# Altium PCB STPMotorControl_1.PcbDoc
Units mm, origin at the board's own origin, x right, y up, seen from the top; angles counter-clockwise.
Board outline 86.99 x 73.02 mm, 4 copper layers (Top Layer, Int1 (GND), Int2 (GND), Bottom Layer), stack 1.369 mm thick; 82 components, 60 nets, 317 pads, 51 vias.
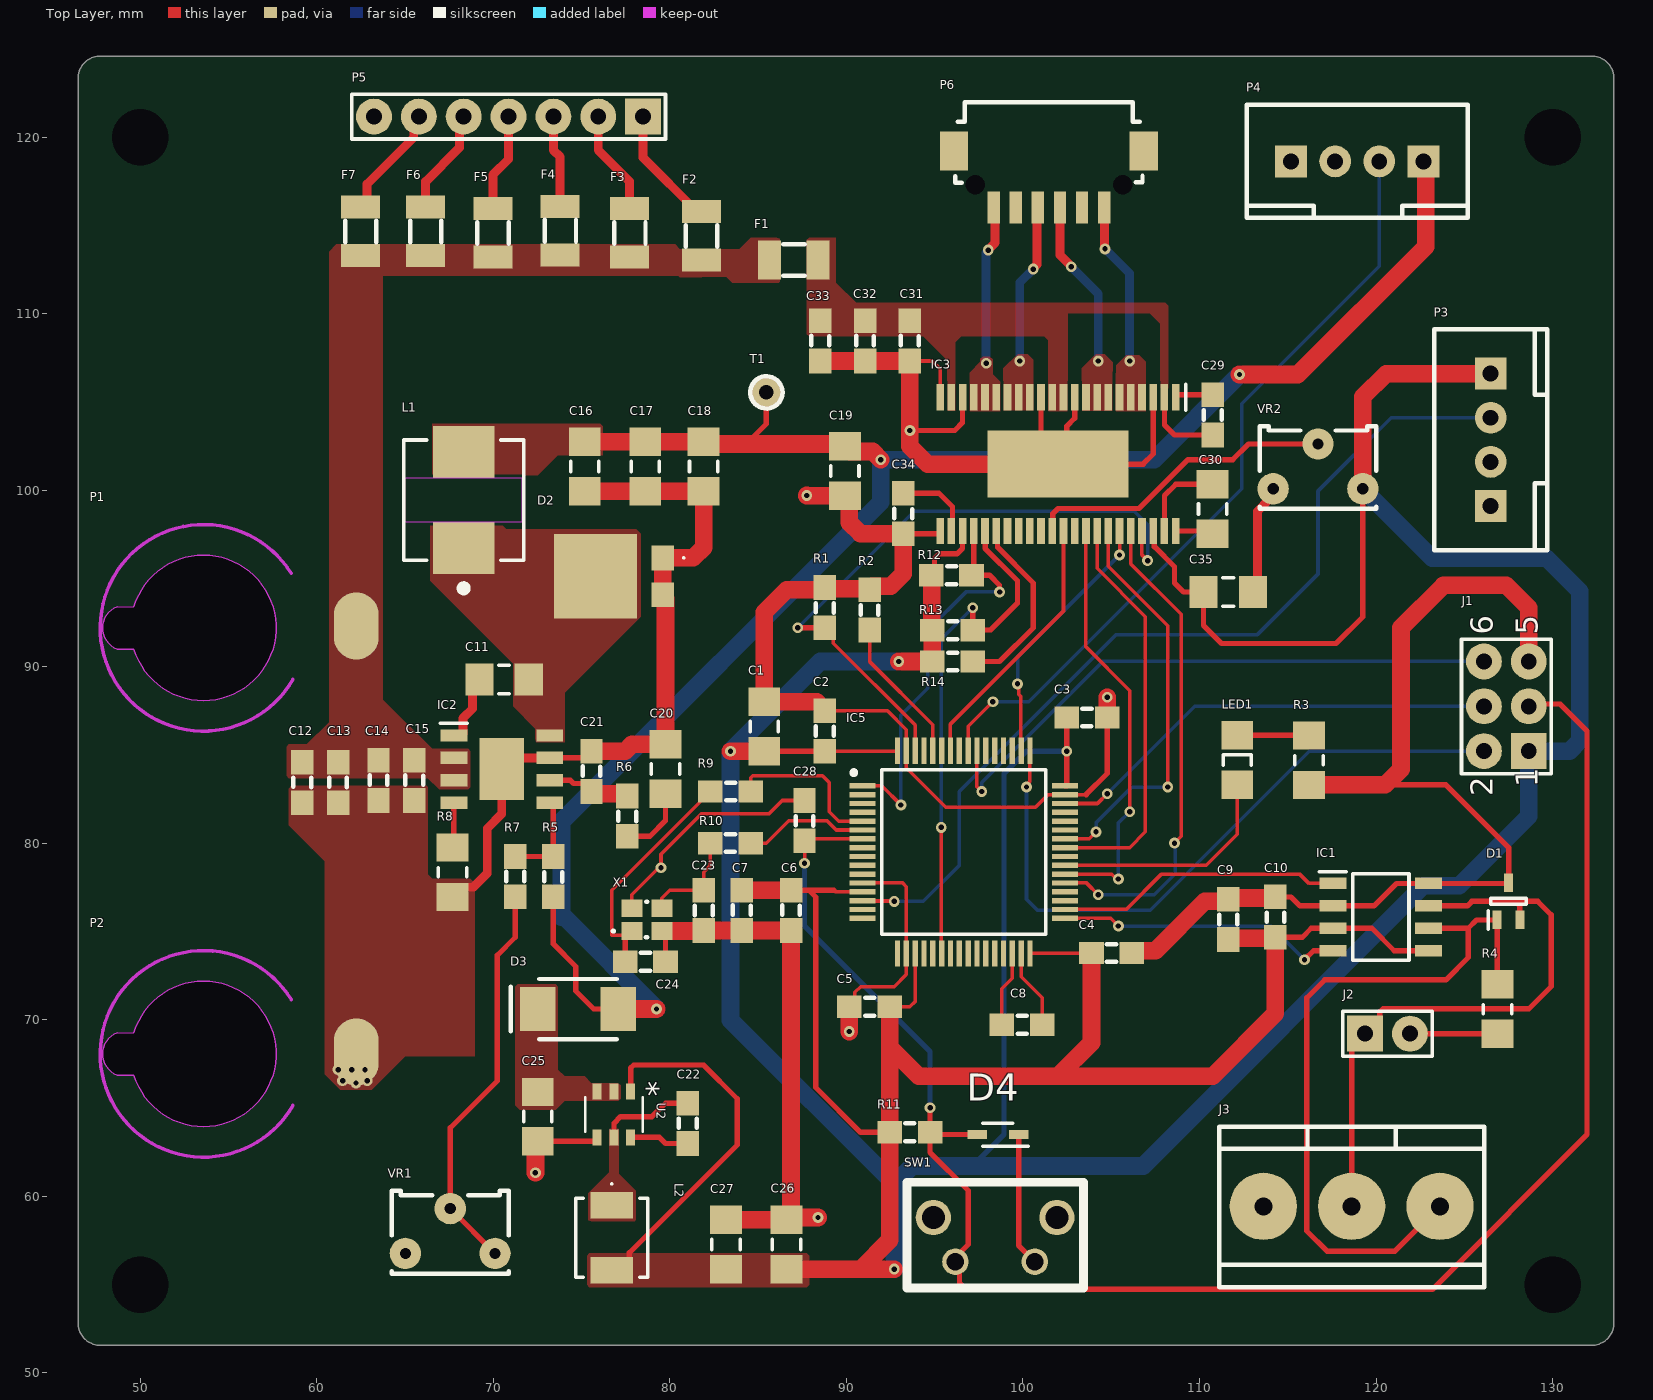
[diagram p0: Top Layer view]
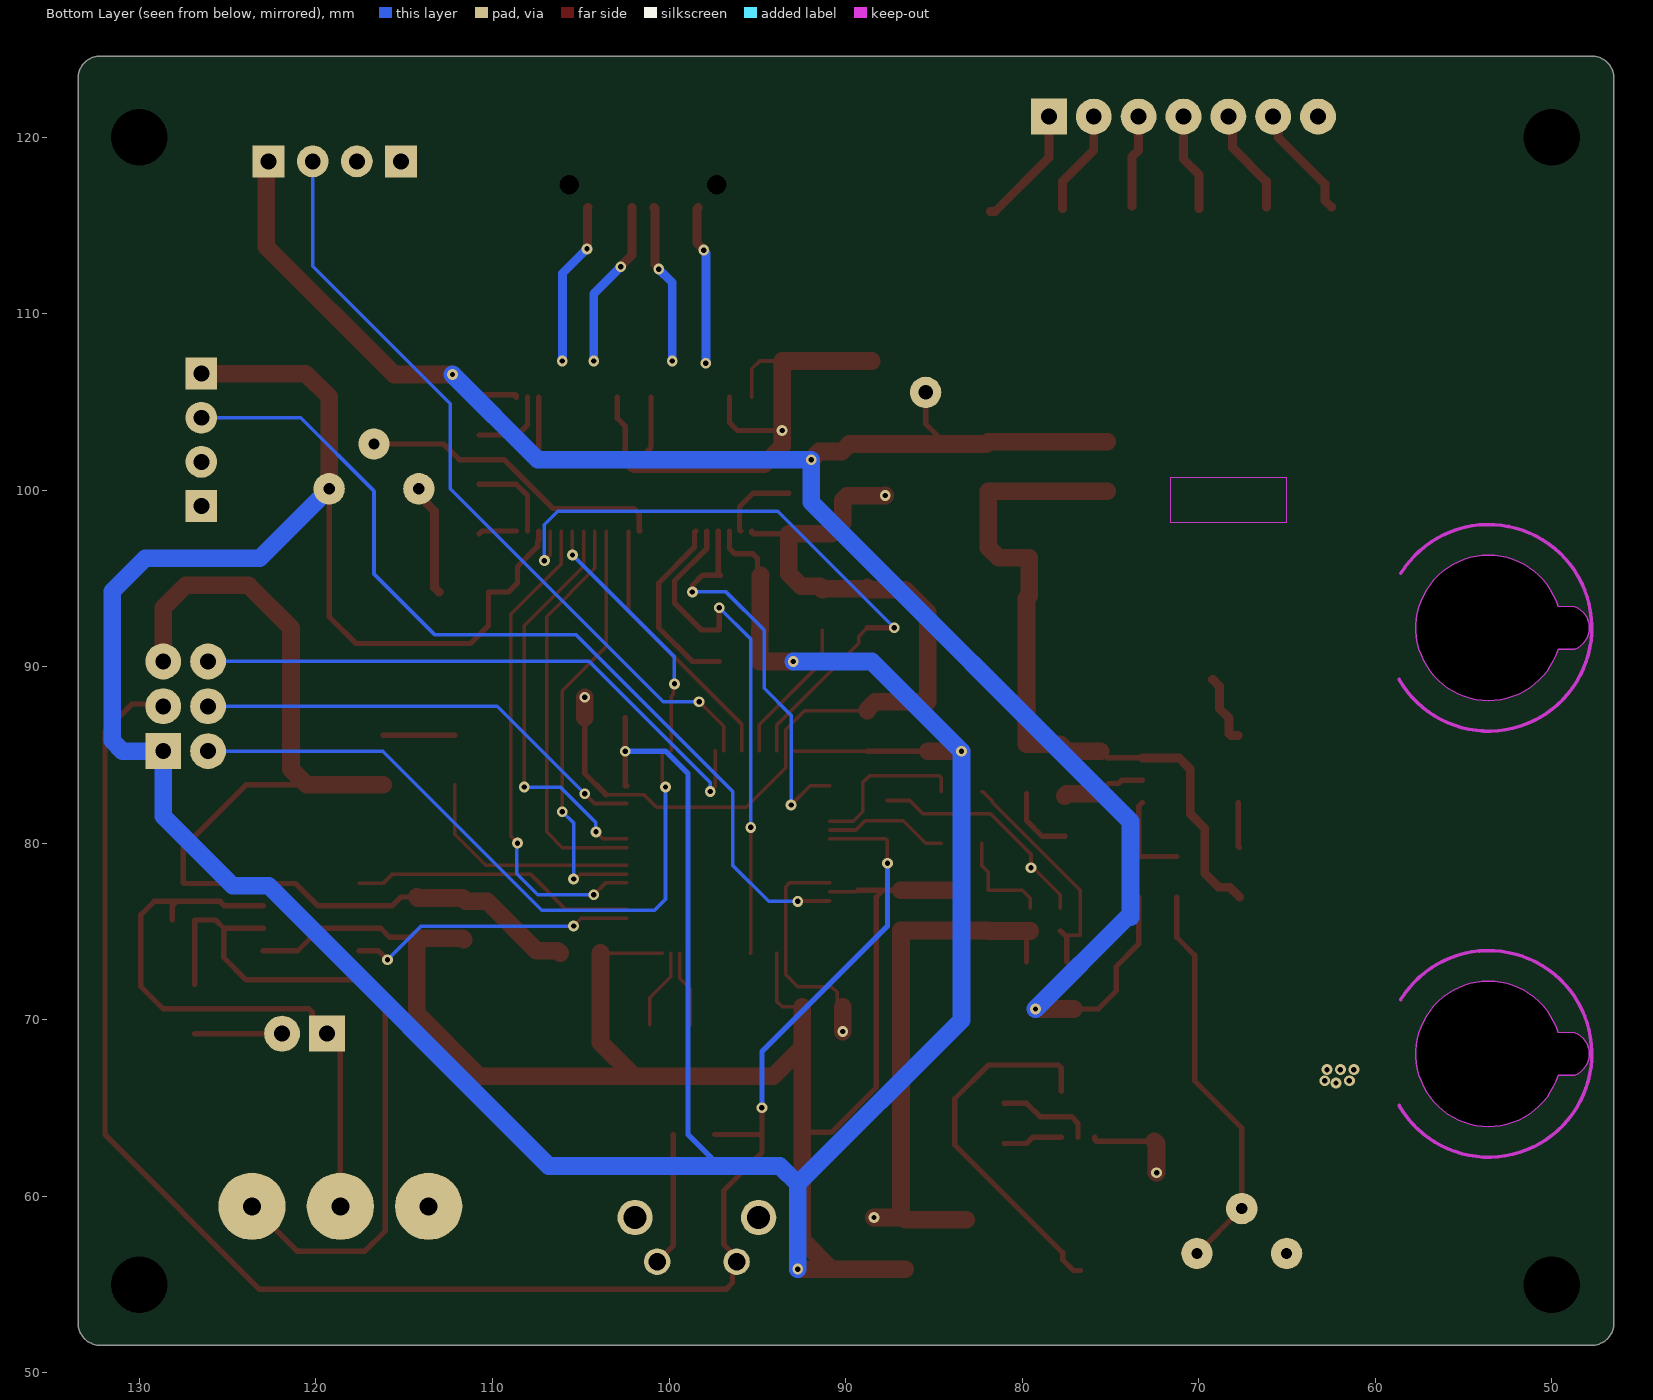
[diagram p1: Bottom Layer view, seen from below]
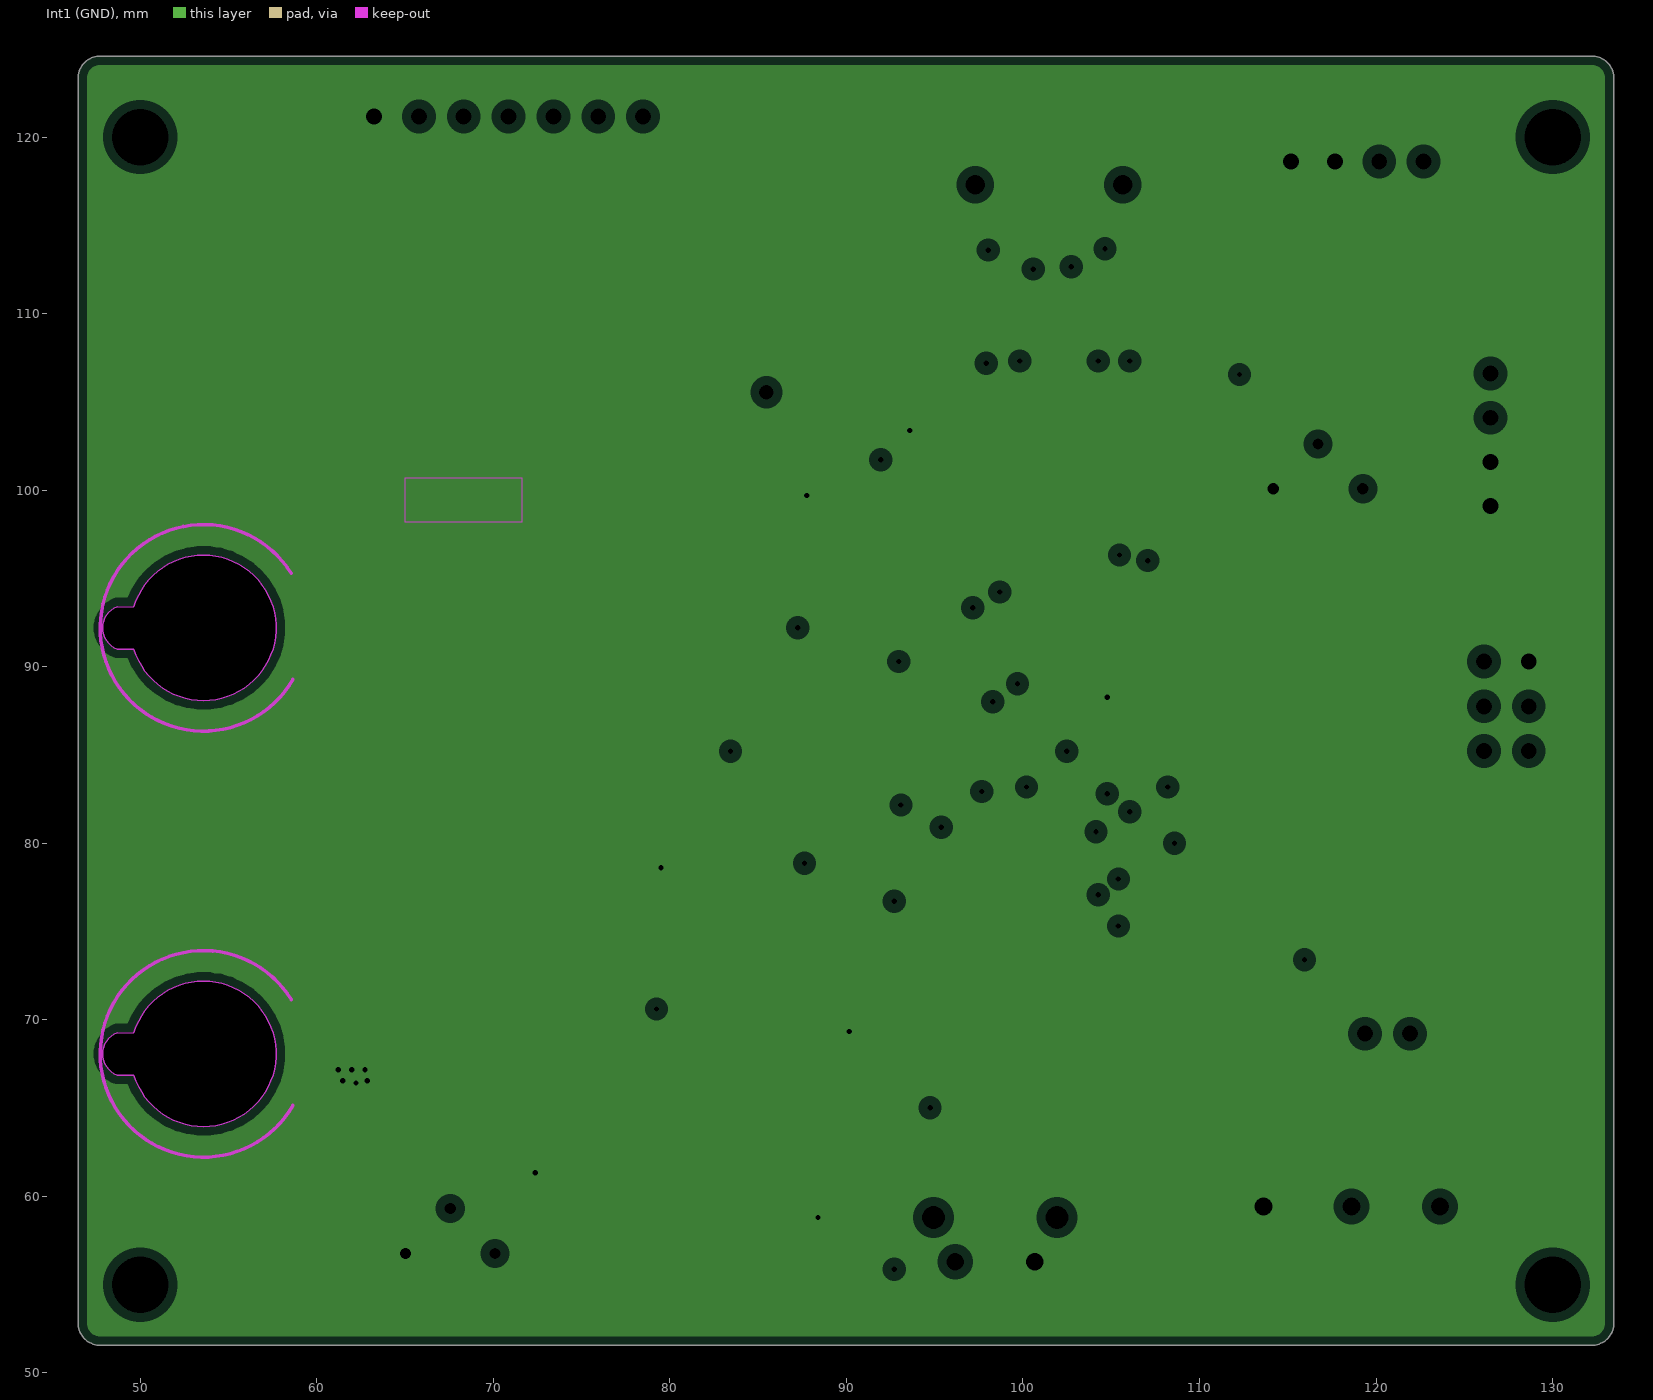
[diagram p2: Int1 (GND), clearances drawn from the general rule]
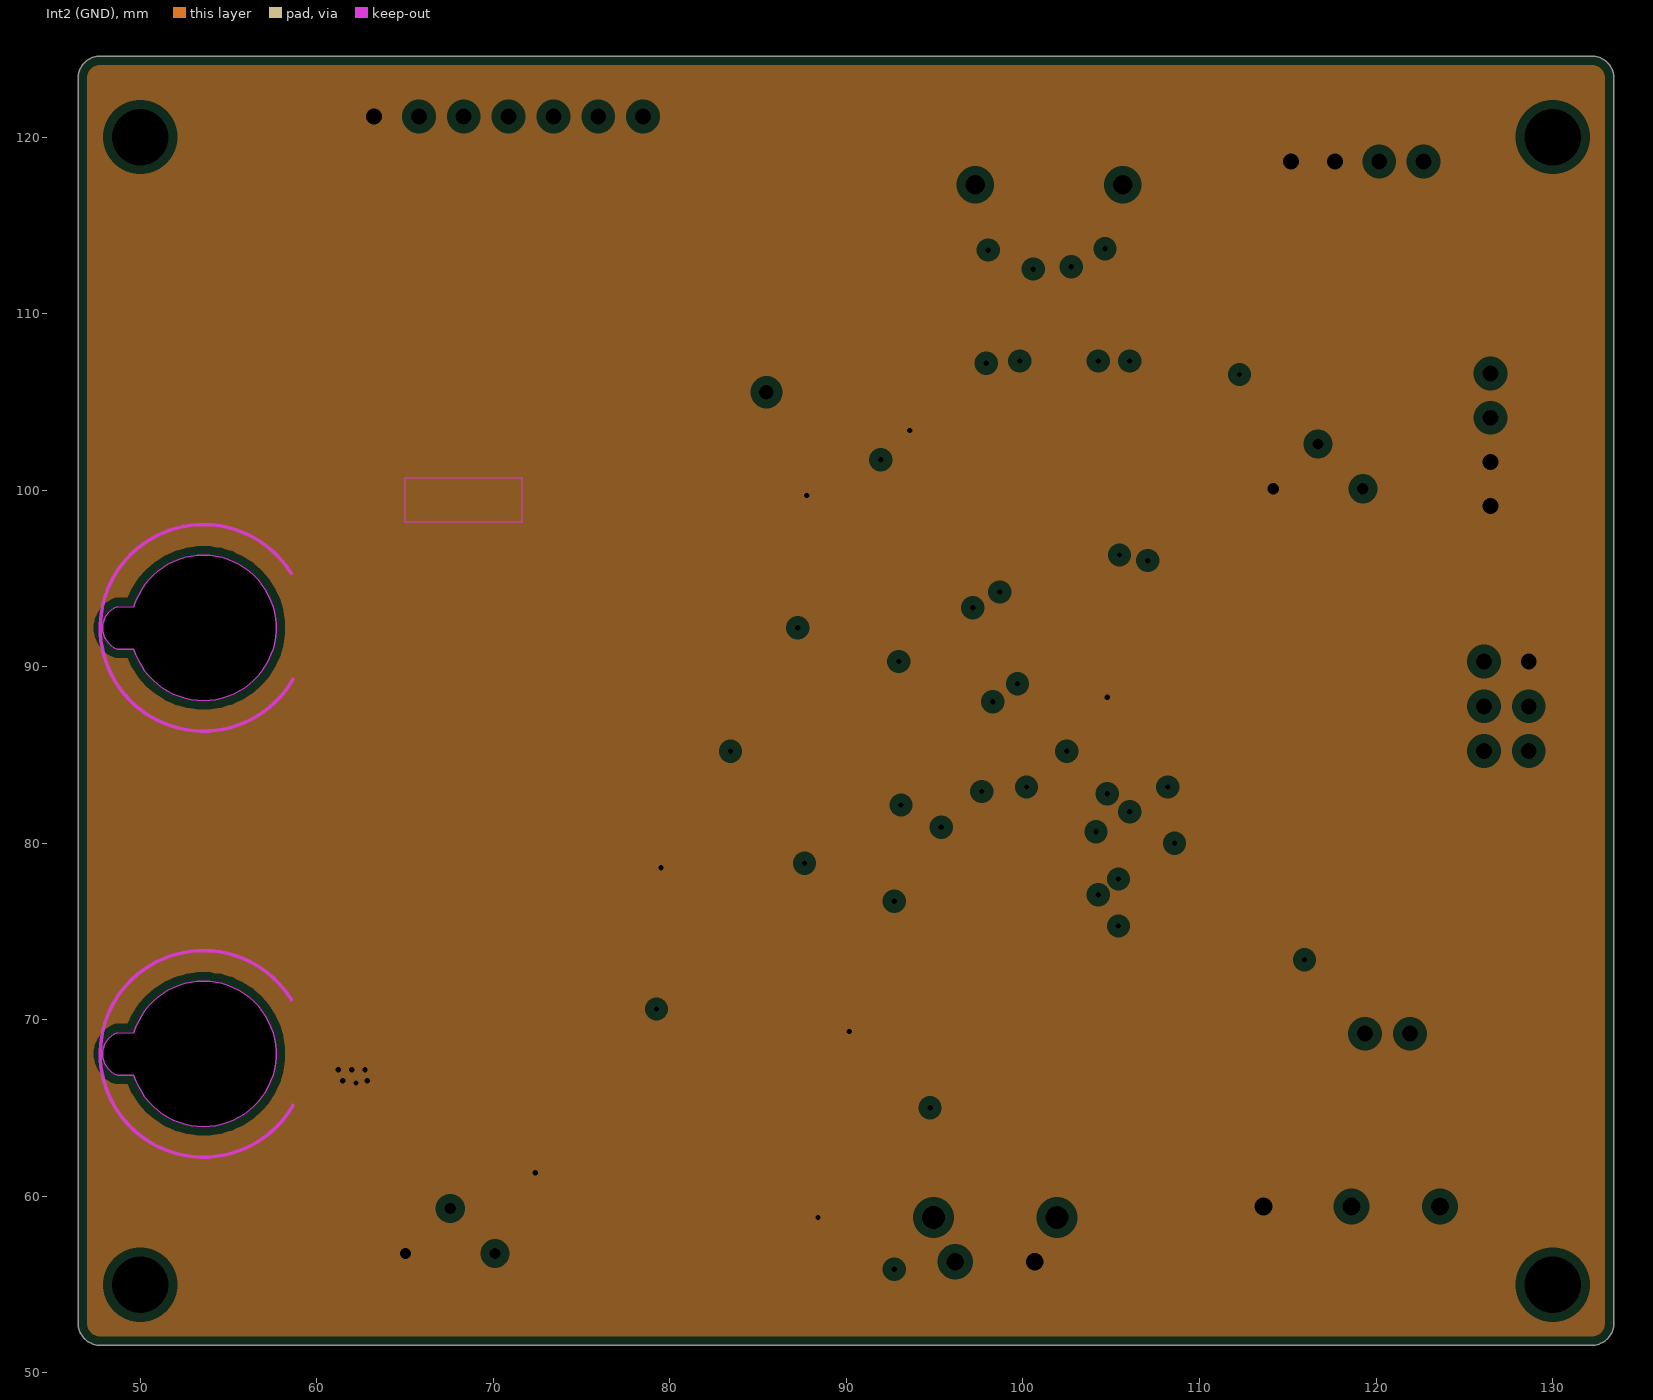
[diagram p3: Int2 (GND), clearances drawn from the general rule]
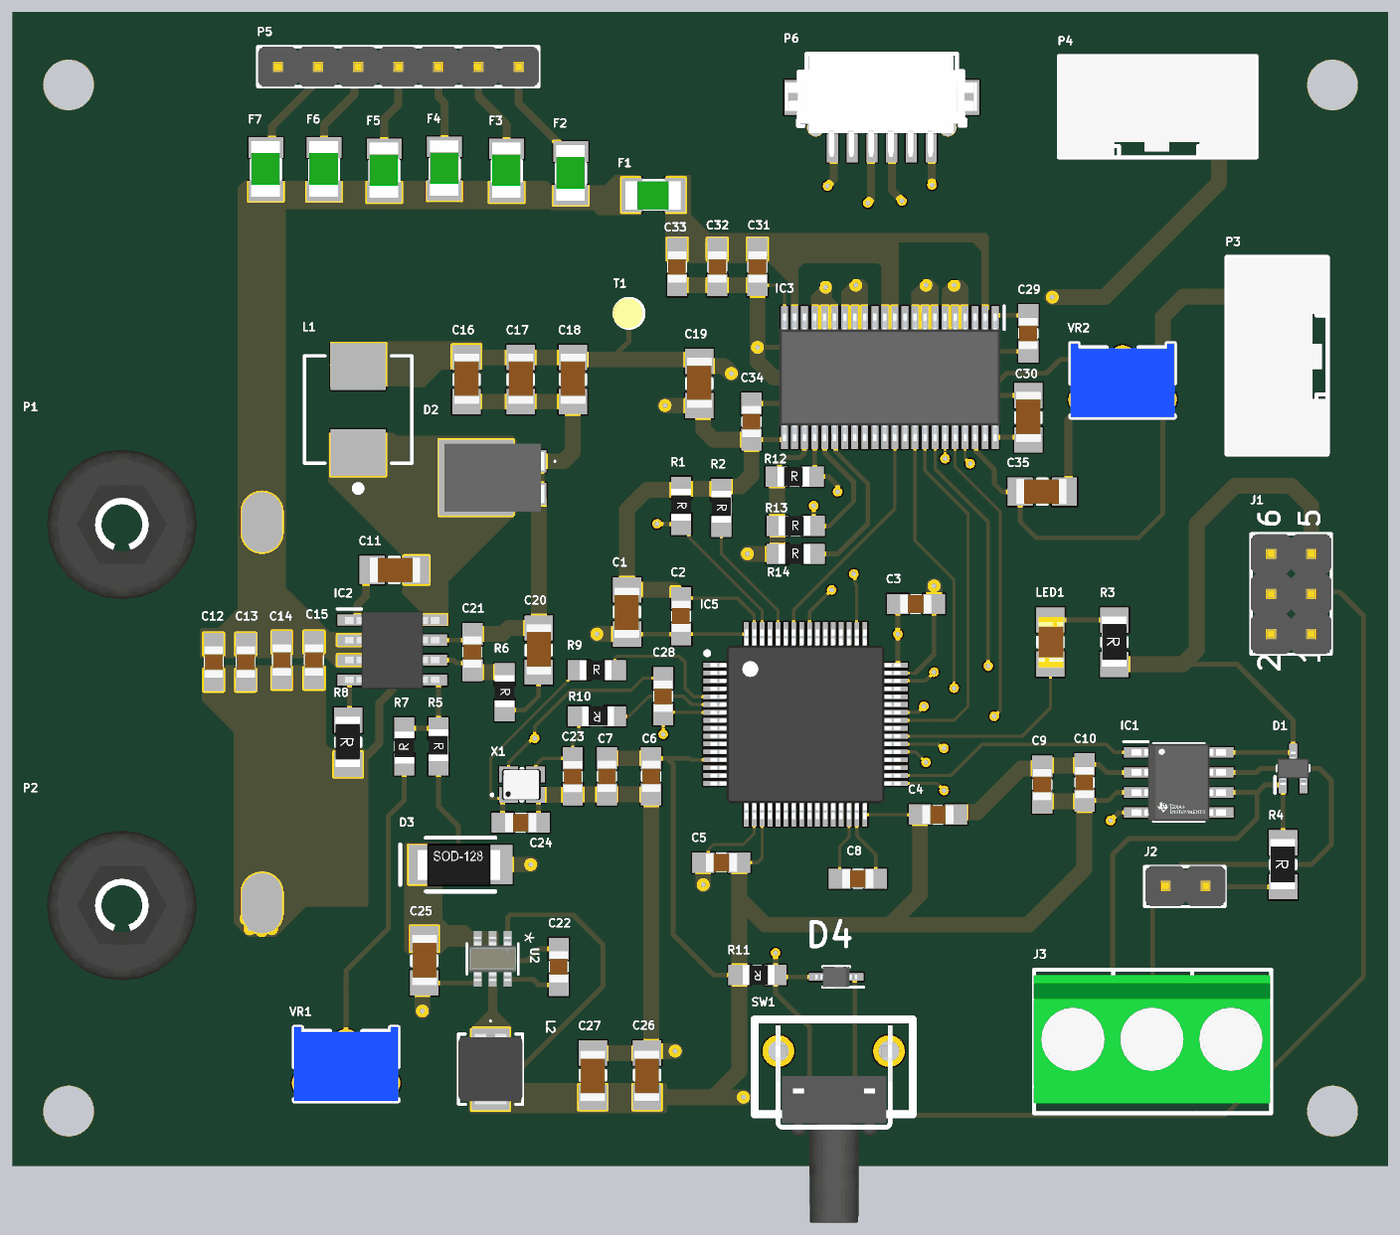
[diagram p4: 3D render of the assembled board from above, using the file's embedded part models]

## Layer stack, top to bottom
Top Solder: solder mask 0.0254, SM-001, Dk 4
Top Layer: signal copper 0.035
Dielectric 1: prepreg 0.1295, PP-017, Dk 4.3
Dielectric 2: prepreg 0.1295, PP-017, Dk 4.3
Int1 (GND): plane copper 0.035, net GND
Dielectric 3: core 0.7112, Core-039, Dk 4.8
Int2 (GND): plane copper 0.035, net GND
Dielectric 4: prepreg 0.1295, PP-017, Dk 4.3
Dielectric 5: prepreg 0.1295, PP-017, Dk 4.3
Bottom Layer: signal copper 0.035
Bottom Solder: solder mask 0.0254, SM-001, Dk 4

## Board outline
47.752,51.564 cw(c47.752,52.834) 46.482,52.834 46.482,123.319 cw(c47.752,123.319) 47.752,124.589 132.207,124.589 cw(c132.207,123.319) 133.477,123.319 133.477,52.834 cw(c132.207,52.834) 132.207,51.564

## Design rules (kind name [scope] priority, off if disabled: settings)
Clearance [All] p1: gap=0.2 ignorepadtopadclearanceinfootprint=TRUE
PlaneClearance [All] p1: clearance=0.508
PlaneConnect [All] p1: planeconnectstyle=Relief reliefexpansion=0.508 reliefentries=4 reliefconductorwidth=0.254 reliefairgap=0.254
PolygonConnect [All] p1: connectstyle=Direct reliefconductorwidth=0.254 reliefentries=4 polygonreliefangle="90 Angle" airgapwidth=0.254
RoutingVias [All] p1: holewidth=12 width=24 viastyle="Through Hole" minholewidth=12 minwidth=24 maxholewidth=12 maxwidth=24
SolderMaskExpansion [All] p1: expansion=0.102 istentingtop=FALSE
SupplyNets "Schematic Supply Nets_3" [InNet('+3V3')] p1: voltage=0.000
SupplyNets "Schematic Supply Nets_2" [InNet('+5V')] p2: voltage=0.000
SupplyNets "Schematic Supply Nets_1" [InNet('+48V')] p3: voltage=0.000
SupplyNets "Schematic Supply Nets" [InNet('GND')] p4: voltage=0.000
UnRoutedNet [All] p1: checkbadconnections=TRUE
Width [All] p1: maxlimit=1 minlimit=0.2 preferedwidth=0.3 minimp=50.000000 maximp=50.000000 favimp=50.000000
27 further rules are at their usual default settings.

## Classes and differential pairs
component class Designator: F2 F3 F4 F5 F6 F7 P3 P4 P5 P6

## Components (designator, comment, footprint, x,y, rotation, side; value= is the part's Value field where it differs from the comment)
C1 "4.7uF" CAP_1206 85.344,88.017 r270 top
C2 "100nF" CAP_0805 88.773,87.503 r270 top
C3 "100nF" CAP_0805 104.775,87.122 r180 top
C4 "100nF" CAP_0805 106.172,73.787 r180 top
C5 "100nF" CAP_0805 90.17,70.739 r0 top
C6 "1uF" CAP_0805 86.868,75.057 r90 top
C7 "100nF" CAP_0805 84.074,75.057 r90 top
C8 "2.2uF" CAP_0805 98.806,69.723 r0 top
C9 "1uF" CAP_0805 111.633,76.835 r270 top
C10 "100nF" CAP_0805 114.3,76.962 r270 top
C11 "0.1uF" CAP_1206 69.215,89.281 r0 top
C12 "2.2uF" CAP_0805 59.182,82.296 r90 top
C13 "2.2uF" CAP_0805 61.214,82.296 r90 top
C14 "2.2uF" CAP_0805 63.5,82.423 r90 top
C15 "2.2uF" CAP_0805 65.532,82.423 r90 top
C16 "47uF" CAP_1206 75.184,99.943 r90 top
C17 "47uF" CAP_1206 78.613,99.943 r90 top
C18 "47uF" CAP_1206 81.915,99.943 r90 top
C19 "10uF" CAP_1206 89.916,99.689 r90 top
C20 "8.2nF" CAP_1206 79.756,82.804 r90 top
C21 "100pF" CAP_0805 75.565,82.931 r90 top
C22 "100nF" CAP_0805 81.026,62.992 r90 top
C23 "7pF" CAP_0805 81.915,77.343 r270 top
C24 "7pF" CAP_0805 77.47,73.279 r0 top
C25 "10uF" CAP_1206 72.517,63.119 r90 top
C26 "22uF" CAP_1206 86.614,58.68 r270 top
C27 "22uF" CAP_1206 83.185,58.674 r270 top
C28 "100nF" CAP_0805 87.63,82.423 r270 top
C29 "1uF" CAP_0805 110.744,105.41 r270 top
C30 "0.1uF" CAP_1206 110.744,97.53 r90 top
C31 "1uF" CAP_0805 93.599,107.315 r90 top
C32 "10nF" CAP_0805 91.059,107.315 r90 top
C33 "10nF" CAP_0805 88.519,107.315 r90 top
C34 "1uF" CAP_0805 93.218,99.822 r270 top
C35 "0.1uF" CAP_1206 113.03,94.234 r180 top
D1 "ESDCAN03-2BWY" SOT65P210X110-3N 127.508,76.708 r90 top
D2 "SS5P6-M3_87A" SS5P6M387A 76.835,95.123 r90 top
D3 "PMEG3050BEP" SOD-128 74.803,70.612 r0 top
D4 "TSD05CDYFR" SOD2613X100N 98.584,63.5 r180 top
F1 "1206L035/16YR" MC36207 88.392,113.03 r180 top
F2 "1206L035/16YR" MC36207 81.788,113.03 r90 top
F3 "1206L035/16YR" MC36207 77.724,113.201 r90 top
F4 "1206L035/16YR" MC36207 73.787,113.328 r90 top
F5 "1206L035/16YR" MC36207 69.977,113.201 r90 top
F6 "1206L035/16YR" MC36207 66.167,113.284 r90 top
F7 "1206L035/16YR" MC36207 62.484,113.284 r90 top
IC1 "TCAN3403DRQ1" SOIC127P600X175-8N 120.269,75.819 r0 top
IC2 "RT6365GSP" SOIC127P600X175-9N 70.485,84.201 r0 top
IC3 "DRV8462DDWR" SOP64P810X120-45N 101.981,101.473 r270 top
IC5 "STM32C552RET6" QFP50P1200X1200X160-64N 96.647,79.502 r0 top
J1 "HDR3X2" HDR2X3_AUT 128.651,85.217 r90 top
J2 "HDR1X2V" HDR1X2_AUT 119.38,69.215 r0 top
J3 "SCREWX3" SCREW3_AUT 113.618,59.436 r0 top
L1 "6.8uH" WE-LHMI_7050 68.326,99.441 r90 top
L2 "3.3uH" SRP4020TA3R3M 76.708,57.658 r270 top
LED1 "LED-RED" LED1206R 112.141,83.312 r90 top
P1 "BS" Banana_AUT 53.594,92.202 r180 top
P2 "BS" Banana_AUT 53.594,68.072 r180 top
P3 "JST 4" XA-4 126.492,99.1 r90 top
P4 "JST 4" XA-4 115.182,118.618 r0 top
P5 "HDR1X7V" HDR1X7_AUT 78.486,121.158 r180 top
P6 "DF13-6P" DF13-6 101.473,117.602 r0 top
R1 "5k1" RES_0805 88.773,94.488 r270 top
R2 "10k" RES_0805 91.313,94.361 r270 top
R3 "1k" RES_1206 116.205,86.106 r270 top
R4 "120R" RES_1206 126.873,72.009 r270 top
R5 "52k3" RES_0805 73.406,79.248 r270 top
R6 "10k5" RES_0805 77.597,82.677 r270 top
R7 "9k1" RES_0805 71.247,76.962 r90 top
R8 "249k" RES_1206 67.691,79.762 r270 top
R9 "0R" RES_0805 82.296,82.931 r0 top
R10 "0R" RES_0805 84.582,80.01 r180 top
R11 "10k" RES_0805 94.742,63.627 r180 top
R12 "10k" RES_0805 94.806,95.187 r0 top
R13 "10k" RES_0805 94.869,92.075 r0 top
R14 "10k" RES_0805 94.869,90.297 r0 top
SW1 "EVQPF" EVQPF203M 98.425,58.801 r0 top
T1 "Terminal1" PAD1_AUT 85.471,105.537 r0 top
U2 "AP63203QWU-7" TSOT26_DIO 76.835,64.643 r270 top
VR1 "2k" 3362S 67.564,58.039 r0 top
VR2 "30k" 3362S 116.713,101.346 r0 top
X1 "24MHz" CX2520SB 77.851,75.027 r0 top

## Footprints (in the part's own frame and the unit in brackets; to place one, negate y for a bottom-side part, rotate by r counter-clockwise, add the part's x,y. Pads: shape width x height; smd on the part's side, far side on the other; paste and mask are expansions set on the pad)
3362S [mil] "3362 - 1/4 ” Square Trimpot, Trimming Potentiometer"
  round 70 hole 25: 1(100,-50) 2(-100,-50) W(0,50)
  silkscreen extent -130,-95 130,90, body extent -130,-95 130,91, height 278
Banana_AUT [mm] "Power (11mm Diameter, 15.5mm Length)"
  oval 2.54x3.81 smd: 1(-8.65,-0.1)
  Keep-Out Layer board cut-out: 3.945,-1.205 2.834,-2.995 0.983,-4.002 -1.124,-3.962 -2.935,-2.885 -3.978,-1.054 -3.978,1.054 -2.935,2.885 -1.124,3.962 0.983,4.002 2.834,2.995 3.945,1.205 3.945,1.205 4.902,1.205 4.902,1.205 5.399,0.849 5.679,0.306 5.679,-0.306 5.399,-0.849 4.902,-1.205 4.902,-1.205 4.902,-1.205
  Keep-Out Layer lines w0.025: 4.902,1.205 cw(c4.416,0) 4.902,-1.205 3.945,-1.205 cw(c0.005,0) 3.945,1.205 4.902,1.205
  Keep-Out Layer lines w0.2: -4.969,-3.079 ccw(c0.005,0) -5.062,2.923
  body extent -5.17,-4.7 5.62,4.8, height 4.57
CAP_0805 [mil] "Body 2.0 x 1.3mm (LxW typ)"
  rect 55x50 smd: 1(0,0) 2(90,0)
  silkscreen extent 35,-20 56,20, body extent 6,-24 85,24, height 47
CAP_1206 [mm] "Body 3.2 x 1.6 mm (LxW typ)"
  rect 1.6x1.8 smd: 1(0,0) 2(2.8,0)
  silkscreen extent 1.1,-0.8 1.7,0.8, body extent -0.15,-0.81 3.05,0.79, height 1.6
CX2520SB [mm] "Crystal Units, Body 2.5×2.0 mm (LxW)"
  rect 1.2x1 smd: 1(0,0) 2(1.7,0) 3(1.7,1.3) 4(0,1.3)
  silkscreen extent -1.1,-0.35 0.87,1.65, body extent -0.45,-0.35 2.05,1.65, height 0.79
DF13-6 [mm] "HIROSE Right Angle, DF13 Series, Surface Mount, Header, 6 Contacts, 1.25 mm"
  rect 1.6x2.2 smd: 0(-5.375,1.6) 0(5.375,1.6)
  round 1 hole 1.1: 0(-4.175,-0.3) 0(4.175,-0.3)
  rect 0.7x1.8 smd: 1(-3.125,-1.6) 2(-1.875,-1.6) 3(-0.625,-1.6) 4(0.625,-1.6) 5(1.875,-1.6) 6(3.125,-1.6)
  silkscreen extent -5.3,-0.2 5.3,4.38, body extent -6.12,-2.15 6.03,4.35, height 3.58
EVQPF203M [mm] "PANASONIC  EVQPF203M  SWITCH, TACTILE, SPST-NO, 20mA, 15VDC"
  round 2 hole 1.3: 0(-3.5,0) 0(3.5,0)
  round 1.5 hole 1: 1(-2.25,-2.5) 2(2.25,-2.5)
  silkscreen extent -5,-4 5,2, body extent -3.67,-10.87 3.73,1.63, height 7
HDR1X2_AUT [mil] "Connector; Header; 2 Position; Pitch 2.54mm, Straight"
  rect 80x80 hole 35.43: 1(0,0)
  round 80 hole 35.43: 2(100,0)
  silkscreen extent -50,-50 150,50, body extent -48,-48 152,52, height 399
HDR1X7_AUT [mil] "Connector; Header; 7 Position; Pitch 2.54mm, Straight"
  rect 80x80 hole 35.43: 1(0,0)
  round 80 hole 35.43: 2(100,0) 3(200,0) 4(300,0) 5(400,0) 6(500,0) 7(600,0)
  silkscreen extent -50,-50 650,50, body extent -50,-50 650,50, height 398
HDR2X3_AUT [mil] "Connector; Header; 3x2 Position"
  rect 80x80 hole 35.43: 1(0,0)
  round 80 hole 35.43: 2(0,100) 3(100,0) 4(100,100) 5(200,0) 6(200,100)
  silkscreen extent -50,-50 250,150, body extent -50,-50 250,150, height 398
LED1206R [mm] "SMD; Red LED; Body 3.2 x 1.6 mm"
  rect 1.6x1.8 smd: A(0,0) K(2.8,0)
  silkscreen extent 1.1,-0.8 1.7,0.8, body extent -0.2,-0.84 3,0.76, height 1.09
MC36207 [mm] "FUSE, PTC RESET. 3.5x1.8x0.75mm (LxWxH)"
  rect 1.3x2.2 smd: 1(0,0) 2(2.75,0)
  silkscreen extent 0.75,-0.9 1.97,0.87, body extent -0.35,-0.88 3.15,0.92, height 0.75
PAD1_AUT [mil] "Teminal Pad; 70 x 70 mil; Hole, 32mil"
  round 70 hole 32: 1(0,0)
  silkscreen extent -36,-36 36,36, body extent -40,-37 34,37, height 319
QFP50P1200X1200X160-64N [mm]
  rect 1.475x0.3 smd: 1(-5.738,3.75) 2(-5.738,3.25) 3(-5.738,2.75) 4(-5.738,2.25) 5(-5.738,1.75) 6(-5.738,1.25) 7(-5.738,0.75) 8(-5.738,0.25) 9(-5.738,-0.25) 10(-5.738,-0.75) 11(-5.738,-1.25) 12(-5.738,-1.75) 13(-5.738,-2.25) 14(-5.738,-2.75) 15(-5.738,-3.25) 16(-5.738,-3.75) 33(5.738,-3.75) 34(5.738,-3.25) 35(5.738,-2.75) 36(5.738,-2.25) 37(5.738,-1.75) 38(5.738,-1.25) 39(5.738,-0.75) 40(5.738,-0.25) 41(5.738,0.25) 42(5.738,0.75) 43(5.738,1.25) 44(5.738,1.75) 45(5.738,2.25) 46(5.738,2.75) 47(5.738,3.25) 48(5.738,3.75)
  rect 0.3x1.475 smd: 17(-3.75,-5.738) 18(-3.25,-5.738) 19(-2.75,-5.738) 20(-2.25,-5.738) 21(-1.75,-5.738) 22(-1.25,-5.738) 23(-0.75,-5.738) 24(-0.25,-5.738) 25(0.25,-5.738) 26(0.75,-5.738) 27(1.25,-5.738) 28(1.75,-5.738) 29(2.25,-5.738) 30(2.75,-5.738) 31(3.25,-5.738) 32(3.75,-5.738) 49(3.75,5.738) 50(3.25,5.738) 51(2.75,5.738) 52(2.25,5.738) 53(1.75,5.738) 54(1.25,5.738) 55(0.75,5.738) 56(0.25,5.738) 57(-0.25,5.738) 58(-0.75,5.738) 59(-1.25,5.738) 60(-1.75,5.738) 61(-2.25,5.738) 62(-2.75,5.738) 63(-3.25,5.738) 64(-3.75,5.738)
  silkscreen extent -6.35,-4.65 4.65,4.65, body extent -6.01,-6.01 6.01,6.01, height 1.54
RES_0805 [mil] "Body 2.0 x 1.3mm (LxW typ)"
  rect 55x50 smd: 1(0,0) 2(90,0)
  silkscreen extent 35,-20 56,20, body extent 3,-25 82,24, height 20
RES_1206 [mm] "Body 3.2 x 1.6 mm (LxW typ)"
  rect 1.6x1.8 smd: 1(0,0) 2(2.8,0)
  silkscreen extent 1.14,-0.8 1.65,0.8, body extent -0.21,-0.8 2.96,0.75, height 0.6
SCREW3_AUT [mil] "PCB Terminal Interlocking Block; CMM; 3 Poles; Pitch, 5 mm"
  round 150 hole 40: 1(0,0) 2(196.85,0) 3(393.7,0)
  silkscreen extent -98,-180 492,178, body extent -100,-155 490,164, height 394
SOD2613X100N [mm]
  rect 1.1x0.5 smd: 1(-1.175,0) 2(1.175,0)
  silkscreen extent -1.73,-0.65 0.85,0.65, body extent -1.33,-0.65 1.33,0.65, height 1
SOD-128 [mm] "SMD, 2 Lead, Body 4.0x2.7mm"
  rect 2x2.5 smd: A(2.286,0) K(-2.286,0)
  silkscreen extent -3.81,-1.7 2.2,1.7, body extent -2.7,-1.37 2.5,1.33, height 1.11
SOIC127P600X175-8N [mm]
  rect 1.528x0.65 smd: 1(-2.711,1.905) 2(-2.711,0.635) 3(-2.711,-0.635) 4(-2.711,-1.905) 5(2.711,-1.905) 6(2.711,-0.635) 7(2.711,0.635) 8(2.711,1.905)
  silkscreen extent -3.47,-2.45 1.6,2.58, body extent -3,-2.45 3,2.45, height 1.75
SOIC127P600X175-9N [mm]
  rect 1.522x0.7 smd: 1(-2.714,1.905) 2(-2.714,0.635) 3(-2.714,-0.635) 4(-2.714,-1.905) 5(2.714,-1.905) 6(2.714,-0.635) 7(2.714,0.635) 8(2.714,1.905)
  rect 2.5x3.5 smd: 9(0,0)
  silkscreen extent -3.47,2.61 -1.95,2.61, body extent -3,-2.45 3,2.45, height 1.46
SOP64P810X120-45N [mm]
  rect 1.475x0.435 smd: 1(-3.788,6.668) 2(-3.788,6.032) 3(-3.788,5.398) 4(-3.788,4.762) 5(-3.788,4.128) 6(-3.788,3.492) 7(-3.788,2.858) 8(-3.788,2.222) 9(-3.788,1.588) 10(-3.788,0.952) 11(-3.788,0.318) 12(-3.788,-0.318) 13(-3.788,-0.952) 14(-3.788,-1.588) 15(-3.788,-2.222) 16(-3.788,-2.858) 17(-3.788,-3.492) 18(-3.788,-4.128) 19(-3.788,-4.762) 20(-3.788,-5.398) 21(-3.788,-6.032) 22(-3.788,-6.668) 23(3.788,-6.668) 24(3.788,-6.032) 25(3.788,-5.398) 26(3.788,-4.762) 27(3.788,-4.128) 28(3.788,-3.492) 29(3.788,-2.858) 30(3.788,-2.222) 31(3.788,-1.588) 32(3.788,-0.952) 33(3.788,-0.318) 34(3.788,0.318) 35(3.788,0.952) 36(3.788,1.588) 37(3.788,2.222) 38(3.788,2.858) 39(3.788,3.492) 40(3.788,4.128) 41(3.788,4.762) 42(3.788,5.398) 43(3.788,6.032) 44(3.788,6.668)
  rect 3.8x8 smd: 45(0,0)
  silkscreen extent -4.52,7.23 -3.05,7.23, body extent -4.05,-7 4.05,7, height 1.2
SOT65P210X110-3N [mm]
  rect 1.05x0.5 smd: 1(-1.05,0.65) 2(-1.05,-0.65) 3(1.05,0)
  silkscreen extent -1.58,-1 0.18,1.15, body extent -1.05,-1 1.05,1, height 1.1
SRP4020TA3R3M [mm]
  rect 1.5x2.4 smd: 1(-1.85,0) 2(1.85,0)
  silkscreen extent -3.1,-2.03 2.22,2.03, body extent -2.22,-2.03 2.22,2.03, height 1.77
SS5P6M387A [mm]
  rect 1.4x1.27 smd: 1(1.04,-2.765) 2(-1.04,-2.765)
  rect 4.8x4.72 smd: 3(0,1.04)
  silkscreen extent 0.99,-4 1.09,-3.9, body extent -2.15,-3.27 2.15,3.05, height 1.3
TSOT26_DIO [mil]
  rect 35.5x20 smd paste+0 mask+0: 1(-51.25,37.4) 2(-51.25,0) 3(-51.25,-37.4) 4(51.25,-37.4) 5(51.25,0) 6(51.25,37.4)
  silkscreen extent -39,-64 39,64, body extent -55,-59 55,59, height 39
WE-LHMI_7050 [mm]
  rect 2.95x3.5 smd paste+0 mask+0.102: 1(-2.725,0) 2(2.725,0)
  Keep-Out Layer region: 1.25,-3.3 -1.25,-3.3 -1.25,3.3 1.25,3.3
  silkscreen extent -5.2,-3.4 3.4,3.4
XA-4 [mm] "XA Connector (JST), 4 Pins, Pitch 2.5mm"
  rect 1.8x1.8 hole 0.9: 1(7.5,0) 4(0,0)
  round 1.8 hole 0.9: 2(5,0) 3(2.5,0)
  silkscreen extent -2.5,-3.2 10,3.2, body extent -2.55,-3.23 9.95,3.17, height 8.8

## Part data
C1 C11 C16 C17 C18 C19 C20 C25 C26 C27 C30 C35: library part "CAPN 1206", "Non Polarized Capacitor, SMD, 1206"
C2 C3 C4 C5 C6 C7 C8 C9 C10 C12 C13 C14 C15 C21 C22 C23 C24 C28 C29 C31 C32 C33 C34: library part "CAPN 0805", "Non Polarized Capacitor, SMD, 0805"
D1: "TVS Diode (Uni-directional)", Manufacturer_Name=STMicroelectronics, Mouser Part Number=511-ESDCAN03-2BWY, Arrow Part Number=ESDCAN03-2BWY, Arrow Price/Stock=https://www.arrow.com/en/products/esdcan03-2bwy/stmicroelectronics.html?utm_currency=USD&region=europe, Datasheet Link=https://www.st.com/resource/en/datasheet/esdcan03-2bwy.pdf, Height=1.1mm, Manufacturer_Part_Number=ESDCAN03-2BWY, Mouser Price/Stock=https://www.mouser.co.uk/ProductDetail/STMicroelectronics/ESDCAN03-2BWY?qs=FqY30PPN9V2iiokjuqa22Q%3D%3D
D2: "Schottky Diode", Arrow Part Number=SS5P6-M3/87A, Manufacturer_Name=Vishay, Mouser Part Number=625-SS5P6-M3/87A, Arrow Price/Stock=https://www.arrow.com/en/products/ss5p6-m387a/vishay?utm_currency=USD&region=nac, Datasheet Link=https://www.vishay.com/docs/88988/ss5p6.pdf, Height=1.2mm, Manufacturer_Part_Number=SS5P6-M3/87A, Mouser Price/Stock=https://www.mouser.co.uk/ProductDetail/Vishay-General-Semiconductor/SS5P6-M3-87A?qs=XGzIaZb%2FFYLx0h%2FWoI%2FVUQ%3D%3D
D3: "Schottky REC, 30V, 5A, SMD", Supplier Part Number 1=1829196, Supplier 1=Farnell
D4: "TVS Diode (Bi-directional)", Manufacturer_Name="Texas Instruments", Mouser Part Number=595-TSD05CDYFR, Arrow Part Number=TSD05CDYFR, Arrow Price/Stock=https://www.arrow.com/en/products/tsd05cdyfr/texas-instruments.html?utm_currency=USD&region=nac, Datasheet Link=https://www.ti.com/lit/ds/symlink/tsd05c.pdf?ts=1691730725852&ref_url=https%253A%252F%252Fwww.ti.com%252Fproduct%252FTSD05C%253FkeyMatch%253DTSD05CDYFR%2526tisearch%253Dsearch-everything%2526usecase%253DOPN, Height=1mm, Manufacturer_Part_Number=TSD05CDYFR, Mouser Price/Stock=https://www.mouser.co.uk/ProductDetail/Texas-Instruments/TSD05CDYFR?qs=Imq1NPwxi74wAiGFX0POZQ%3D%3D
F1 F2 F3 F4 F5 F6 F7: "Fuse, PTC Reset, 350mA Hold, 750mA Tripping, 16v", Supplier Part Number 1=1822203, Supplier 1=Element14
IC1: "Integrated Circuit", Manufacturer_Name="Texas Instruments", Mouser Part Number=595-TCAN3403DRQ1, Arrow Part Number=TCAN3403DRQ1, Arrow Price/Stock=https://www.arrow.com/en/products/tcan3403drq1/texas-instruments?utm_currency=USD&region=nac, Datasheet Link=https://www.ti.com/lit/ds/symlink/tcan3403-q1.pdf?ts=1732780388772&ref_url=https%253A%252F%252Fwww.ti.com%252Fproduct%252FTCAN3403-Q1%252Fpart-details%252FTCAN3403DRQ1, Height=1.75mm, Manufacturer_Part_Number=TCAN3403DRQ1, Mouser Price/Stock=https://www.mouser.co.uk/ProductDetail/Texas-Instruments/TCAN3403DRQ1?qs=VVKQmw408U8i3BeOClYB9g%3D%3D
IC2: "Integrated Circuit", Manufacturer_Name=RICHTEK, Mouser Part Number=835-RT6365GSP, Datasheet Link=https://www.richtek.com/assets/product_file/RT6365/DS6365-02.pdf, Height=1.753mm, Manufacturer_Part_Number=RT6365GSP, Mouser Price/Stock=https://www.mouser.co.uk/ProductDetail/Richtek/RT6365GSP?qs=amGC7iS6iy%252BGHkAL3RFUug%3D%3D
IC3: "Integrated Circuit", Manufacturer_Name="Texas Instruments", Mouser Part Number=595-DRV8462DDWR, Arrow Part Number=DRV8462DDWR, Arrow Price/Stock=https://www.arrow.com/en/products/drv8462ddwr/texas-instruments?utm_currency=USD&region=nac, Datasheet Link=https://www.ti.com/lit/gpn/drv8462, Height=1.2mm, Manufacturer_Part_Number=DRV8462DDWR, Mouser Price/Stock=https://www.mouser.co.uk/ProductDetail/Texas-Instruments/DRV8462DDWR?qs=rQFj71Wb1eVexvYNsDfnvA%3D%3D
IC5: "Integrated Circuit", Manufacturer_Name=STMicroelectronics, Datasheet Link=https://www.st.com/resource/en/datasheet/stm32c551cc.pdf, Height=1.6mm, Manufacturer_Part_Number=STM32C552RET6
J1: "Header, 3-Pin, Dual row, 2.54mm Pitch, Straight", Supplier Part Number 1=9733574, Supplier 1=Farnell
J2: "Header, Plug, 2.54mm, 2 Pins, Straight", Supplier Part Number 1=2254030, Supplier 1=Farnell
J3: "Terminal Block, PCB, 3Way, Pitch 5mm", Supplier Part Number 1=9632689, Supplier 1=Farnell
L1: library part WE-LHMI_7050, "Power Inductor, 6.8Uh, Shielded, 6.6A Rohs Compliant: Yes", Package=None, Check_prices=https://www.snapeda.com/parts/7443734948068/Wurth+Electronics/view-part/?ref=eda, MF="Wurth Electronics", MP=7443734948068, SnapEDA_Link=https://www.snapeda.com/parts/7443734948068/Wurth+Electronics/view-part/?ref=snap
L2: library part SRP4020TA-3R3M, "Inductor", Manufacturer_Name=Bourns, Mouser Part Number=652-SRP4020TA-3R3M, Arrow Part Number=SRP4020TA-3R3M, Arrow Price/Stock=https://www.arrow.com/en/products/srp4020ta-3r3m/bourns?region=nac, Datasheet Link=https://www.bourns.com/docs/Product-Datasheets/SRP4020TA.pdf, Height=2mm, Manufacturer_Part_Number=SRP4020TA-3R3M, Mouser Price/Stock=https://www.mouser.co.uk/ProductDetail/Bourns/SRP4020TA-3R3M?qs=Ph8%2FHnX6CQx4K7XcRwo6CA%3D%3D
LED1: library part "SMD 1206 LED-RED", "RED LED, Case 1206", Supplier Part Number 1=8530017, Supplier 1=Farnell
P1 P2: library part "Banana Socket", "Banana Socket, 4mm, Panel, Black, 10A", Supplier Part Number 1=1101113, Supplier 1=Farnell
P3 P4: library part "JST XA Header 4", "JST XA Header, 4-Pin, Pitch 2.5mm", Supplier Part Number 1=9492089, Supplier 1=Farnell
P5: "Header, Plug, 2.54mm, 7 Pins, Straight", Supplier Part Number 1=9731121, Supplier 1=Farnell
P6: "HIROSE(HRS)  DF13-6P-1.25H(20)  Wire-To-Board Connector, Right Angle, DF13 Series, Surface Mount, Header, 6 Contacts, 1.25 mm", Supplier Part Number 1=1324928, Supplier 1=Farnell
R1 R2 R5 R6 R7 R9 R10 R11 R12 R13 R14: library part "Resistor 0805", "Resistor, SMD, 0805"
R3 R4 R8: library part "Resistor 1206", "Resistor, SMD, 1206"
SW1: "PANASONIC  EVQPF203M  SWITCH, TACTILE, SPST-NO, 20mA, 15VDC", Supplier Part Number 1=2079505, Supplier 1=Farnell
T1: "Terminal, Pad 70x70mil, Hole 32 mil"
U2: "Description", Manufacturer_Name="Diodes Inc", Copyright="Copyright (C) 2026 Ultra Librarian. All rights reserved.", Manufacturer_Part_Number=AP63203QWU-7, RefDes=RefDes, Type="Power Management"
VR1 VR2: library part 3362S-1-202LF, "3362S Series, 1/4 ” Square  Potentiometer, 2k, 10%, 0.5 Watts, 1Turn", Supplier Part Number 1=2321842, Supplier 1=Farnell
X1: library part CX2520SB24000D0FLJZZ, "Crystals, 24MHz", Supplier Part Number 1=1657889, Supplier 1=Farnell

## Free pads (board coordinates)
  round 1.524 hole 3.2: 2(50,55) 2(50,120) 2(130,55) 2(130,120)

## Via types
v1: diameter 0.61, hole 0.305, Top Layer to Bottom Layer, 51 vias

## Nets (pads, with @x,y where several pads share a name; then routed paths per layer and width w, separated by ;. In a path a pad name is that pad's centre, name@x,y a point inside that pad or via, vN(x,y) a via of type N, cw(c..) or ccw(c..) an arc to the next point about the centre after c; other vN are vias at no path point)
+3V3: C1.2 C2.2 C3.2 C4.2 C5.2 C6.2 C7.2 C9.2 C10.2 C26.2 C27.2 C35.2 IC1.3 IC1.5 IC3.25 IC3.42 IC5.13 IC5.19 IC5.32 IC5.48 IC5.64 J1.1 L2.2 P3.1 R11.2 R12.1 R13.1 R14.1 U2.1 VR2.1 | length 330
  Top Layer w0.2: C2.2 92.874,85.217 IC5.64 ; 89.281,77.343 89.372,77.252 IC5.13 ; C5.2 93.599,70.739 93.897,71.037 IC5.19 ; IC5.32 103.863,73.764 C4.2
  Top Layer w0.3: L2.2 77.101,55.808 77.701,56.408 77.701,56.801 83.82,62.92 83.82,65.532 81.915,67.437 77.961,67.437 77.785,67.261 U2.1 ; C1.2 C2.2 ; C6.2 89.281,77.343 ; 87.975,77.252 88.265,76.962 88.265,66.167 90.805,63.627 R11.2 ; R12.1 94.996,95.377 94.996,96.139 95.25,96.393 96.265,96.393 96.574,96.702 96.574,97.676 IC3.25 ; IC5.48 102.489,83.252 v1(102.489,85.217) C3.2 ; IC3.42 107.379,97.164 107.446,97.097 107.446,96.803 108.585,95.663 108.585,94.742 109.093,94.234 C35.2 110.23,92.335 111.252,91.313 117.729,91.313 117.732,91.31 119.253,92.832 VR2.1 ; C10.2 115.824,74.676 116.332,75.184 IC1.3 119.761,75.184 121.031,73.914 IC1.5
  Top Layer w1: v1(83.439,85.217) C1.2 ; C7.2 C6.2 ; C26.2 90.805,55.88 ; C5.2 92.456,68.453 ; v1(92.71,55.88) 90.805,55.88 ; v1(92.964,90.297) R14.1 R13.1 94.838,92.106 94.838,95.156 R12.1 ; C4.2 103.886,68.707 101.981,66.802 ; C9.2 111.697,74.612 114.236,74.612 114.3,74.549 114.3,70.358 110.744,66.802 101.981,66.802 ; VR2.1 119.253,105.283 120.57,106.6 P3.1 ; 90.805,55.88 92.456,57.531 R11.2 92.456,68.453 ; 92.456,68.453 94.107,66.802 101.981,66.802
  Bottom Layer w0.3: 97.155,61.722 98.933,63.5 98.933,83.947 100.203,85.217 v1(102.489,85.217)
  Bottom Layer w1: v1(92.71,55.88) 92.71,60.706 ; v1(92.964,90.297) 88.519,90.297 v1(83.439,85.217) 83.439,69.977 92.71,60.706 ; VR2.1 123.19,96.139 129.667,96.139 131.542,94.264 131.542,85.803 130.956,85.217 J1.1 128.651,81.534 124.714,77.597 122.682,77.597 106.807,61.722 97.155,61.722 93.726,61.722 92.71,60.706
+5V: C16.2 C17.2 C18.2 C19.2 D3.A L1.2 P4.1 R5.2 T1.1 | length 112.9
  Top Layer w0.3: R5.2 73.406,74.295 74.676,73.025 74.676,71.628 75.692,70.612 D3.A ; 84.328,102.616 85.471,103.759 T1.1
  Top Layer w1: C16.2 C17.2 C18.2 82.042,102.616 84.328,102.616 C19.2@89.789,102.616 ; D3.A v1(79.248,70.612) ; C19.2 90.216,102.189 91.486,102.189 v1(91.948,101.727) ; v1(112.268,106.553) 115.57,106.553 122.809,113.792 122.809,118.491 P4.1
  Bottom Layer w1: v1(79.248,70.612) 74.041,75.819 73.865,75.819 73.865,81.231 91.948,99.314 v1(91.948,101.727) 107.442,101.727 v1(112.268,106.553)
+48V: C12.2 C13.2 C14.2 C15.2 F1.2 F2.1 F3.1 F4.1 F5.1 F6.1 F7.1 IC2.2 IC2.3 P1.1
ADC_DRV1: IC5.14 P3.2 | length 52.2
  Top Layer w0.2: IC5.14 90.931,76.73 92.688,76.73 v1(92.71,76.708)
  Bottom Layer w0.2: v1(92.71,76.708) 94.361,76.708 96.393,78.74 96.393,82.931 105.283,91.821 113.284,91.821 116.713,95.25 116.713,99.949 120.864,104.1 P3.2
AOUT1_DRV1: IC3.4 IC3.5 IC3.6 P6.6 | length 9.3
  Top Layer w0.5: P6.6 104.627,115.973 104.627,113.686 v1(104.648,113.665)
  Bottom Layer w0.5: v1(104.648,113.665) 106.045,112.268 v1(106.045,107.315)
AOUT2_DRV1: IC3.7 IC3.8 IC3.9 P6.4 | length 9.6
  Top Layer w0.5: P6.4 102.108,115.992 102.108,113.314 102.743,112.679 v1(102.743,112.649)
  Bottom Layer w0.5: v1(102.743,112.649) 104.267,111.125 v1(104.267,107.315)
BOUT1_DRV1: IC3.14 IC3.15 IC3.16 P6.3 | length 9.1
  Top Layer w0.5: v1(100.584,112.522) 100.584,112.552 100.794,112.762 100.794,115.948 P6.3
  Bottom Layer w0.5: v1(99.822,107.315) 99.822,111.76 v1(100.584,112.522)
BOUT2_DRV1: IC3.17 IC3.18 IC3.19 P6.1 | length 9.1
  Top Layer w0.5: v1(98.04,113.597) 98.04,113.626 98.425,114.011 98.425,115.925 P6.1
  Bottom Layer w0.5: v1(97.917,107.188) 97.917,113.444 98.04,113.567 v1(98.04,113.597)
DEBUG_SWCLK: IC5.49 J1.2 | length 38.1
  Top Layer w0.2: v1@100.33,83.439 100.397,83.506 IC5.49
  Bottom Layer w0.2: v1(100.203,83.185) 100.203,76.835 100.825,76.213 107.219,76.213 116.223,85.217 J1.2
DEBUG_SWDIO: IC5.46 J1.4 | length 26
  Top Layer w0.2: IC5.46 104.223,82.252 v1(104.775,82.804)
  Bottom Layer w0.2: v1(104.775,82.804) 109.728,87.757 J1.4
DEBUG_SWO: IC5.55 J1.6 | length 34.2
  Top Layer w0.2: IC5.55 97.397,83.197 v1(97.663,82.931)
  Bottom Layer w0.2: v1(97.663,82.931) 97.663,83.439 104.521,90.297 J1.6
DIR_DRV1: IC3.40 IC5.37 | length 27.8
  Top Layer w0.2: IC5.37 103.604,77.752 v1(104.267,77.089) ; IC3.40 106.109,95.821 108.966,92.964 108.966,80.391 v1(108.585,80.01)
  Bottom Layer w0.2: v1(104.267,77.089) 107.442,77.089 108.629,78.276 108.629,79.966 v1(108.585,80.01)
ENABLE_DRV_ALL: IC3.41 IC5.62 R1.2 | length 37.3
  Top Layer w0.2: R1.2 89.261,91.714 89.261,91.333 93.897,86.697 IC5.62 ; IC3.41 106.743,96.33 v1(107.061,96.012)
  Top Layer w0.3: v1(87.249,92.202) R1.2
  Bottom Layer w0.2: v1(87.249,92.202) 93.853,98.806 106.299,98.806 107.061,98.044 v1(107.061,96.012)
FDCAN1_RX: IC1.4 IC5.33 | length 16.4
  Top Layer w0.2: IC5.33 104.969,75.752 v1(105.41,75.311)
  Top Layer w0.3: v1(115.951,73.406) 116.459,73.914 IC1.4
  Bottom Layer w0.2: v1(105.41,75.311) 114.046,75.311 v1(115.951,73.406)
FDCAN1_TX: IC1.1 IC5.34 | length 16.2
  Top Layer w0.2: IC5.34 105.843,76.252 107.823,78.232 115.697,78.232 116.205,77.724 IC1.1
GND: C1.1 C2.1 C3.1 C4.1 C5.1 C6.1 C7.1 C9.1 C10.1 C12.1 C13.1 C14.1 C15.1 C16.1 C17.1 C18.1 C19.1 C20.2 C21.2 C23.2 C24.2 C25.1 C26.1 C27.1 C28.1 C31.1 C32.1 C33.1 C34.2 C35.1 D1.3 D2.1 D2.2 D4.1 IC1.2 IC1.8 IC2.7 IC2.9 IC3.3 IC3.10 IC3.13 IC3.20 IC3.22 IC3.23 IC3.45 IC5.12 IC5.18 IC5.47 IC5.63 J1.5 J3.1 P2.1 P3.3 P3.4 P4.3 P4.4 P5.7 R1.1 R2.1 R3.2 R8.2 SW1.2 U2.4 VR1.2 VR2.2 X1.2 X1.4 | length 279.5
  Top Layer w0.2: X1.4 77.851,77.089 79.297,78.535 79.424,78.535 v1(79.502,78.613) 79.502,79.375 81.788,81.661 85.598,81.661 86.36,82.423 C28.1 ; C2.1 92.329,87.503 93.397,86.435 IC5.63 93.397,84.276 95.631,82.042 100.711,82.042 101.421,82.752 IC5.47 103.58,82.752 ; C5.1 90.48,71.049 90.48,71.557 90.805,71.882 92.71,71.882 93.397,72.569 IC5.18 93.397,77.545 93.19,77.752 IC5.12 ; C31.1 94.869,107.315 95.313,106.871 IC3.22
  Top Layer w0.3: C25.1 75.781,63.119 75.885,63.223 U2.4 ; IC2.7 75.184,84.836 C21.2 ; X1.2 79.756,74.822 C24.2 ; C34.2 95.245,97.536 95.313,97.604 IC3.23 ; v1(93.599,103.378) 96.139,103.378 96.583,103.822 IC3.20 ; D4.1 99.759,57.217 SW1.2 ; IC3.13 101.029,102.425 IC3.45 ; IC3.10 102.933,104.076 102.489,103.632 102.489,101.981 IC3.45 ; 103.58,82.752 104.775,83.947 C3.1 ; IC3.3 107.379,102.045 106.807,101.473 IC3.45 ; C10.1 115.189,76.962 115.697,76.454 IC1.2 119.888,76.454 121.158,77.724 IC1.8 127.474,77.724 D1.3 127.508,79.756 123.958,83.306 R3.2
  Top Layer w0.5: R8.2 68.241,77.512 68.876,77.512 69.659,78.295 69.659,80.835 70.485,81.661 IC2.9 71.12,84.836 IC2.7 ; C35.1 113.284,94.488 113.284,98.806 113.928,99.45 113.928,99.831 VR2.2
  Top Layer w1: v1(72.39,61.341) 72.39,62.992 C25.1 ; C16.1 C17.1 C18.1 81.915,96.749 81.329,96.163 D2.1 D2.2 ; C21.2 77.47,85.217 77.857,85.604 C20.2 79.756,93.862 D2.2@79.6,94.018 ; X1.2 81.885,75.027 C23.2 C7.1 C6.1 ; C27.1 83.188,58.677 86.611,58.677 86.868,58.934 C6.1@86.868,74.993 ; C26.1@86.735,58.801 v1(88.392,58.801) ; v1(87.757,99.695) 87.763,99.689 C19.1 90.17,99.435 90.17,98.171 90.805,97.536 C34.2 93.218,95.272 92.505,94.559 91.448,94.559 91.313,94.424 R2.1 91.249,94.424 88.837,94.424 R1.1 88.646,94.361 86.614,94.361 85.344,93.091 C1.1 88.323,88.017 88.773,87.566 C2.1 ; C33.1 C32.1 C31.1 v1(93.599,103.378) 93.599,102.489 94.615,101.473 IC3.45 ; v1(90.17,69.342) C5.1 ; C3.1 v1(104.775,88.265) ; C4.1 106.307,73.922 107.512,73.922 110.301,76.712 111.51,76.712 111.697,76.898 114.236,76.898 C10.1 ; R3.2 120.517,83.306 121.412,84.201 121.412,92.202 123.825,94.615 127.381,94.615 128.651,93.345 J1.5
  other v1: 62.23,66.421 61.468,66.548 62.865,66.548 61.214,67.183 61.976,67.183 62.738,67.183
NetC8_1: C8.1 IC5.30 | length 4.3
  Top Layer w0.2: C8.1 98.806,71.755 99.397,72.346 IC5.30
NetC8_2: C8.2 IC5.31 | length 4.5
  Top Layer w0.2: IC5.31 99.897,72.442 101.092,71.247 C8.2
NetC11_1: C11.1 IC2.1 | length 4
  Top Layer w0.5: IC2.1 68.182,86.106 68.282,86.206 68.282,87.078 68.834,87.63 68.834,88.9 C11.1
NetC11_2: C11.2 D2.3 IC2.8 L1.1
NetC20_1: C20.1 R6.2 | length 4.1
  Top Layer w0.3: R6.2 78.867,80.391 79.756,81.28 C20.1
NetC21_1: C21.1 IC2.6 R6.1 | length 4.8
  Top Layer w0.3: IC2.6 74.373,83.566 74.549,83.39 75.106,83.39 C21.1
  Top Layer w1: C21.1 75.692,82.804 77.47,82.804 R6.1
NetC22_1: C22.1 U2.6 | length 3.4
  Top Layer w0.3: U2.6 79.407,63.341 79.756,62.992 C22.1
NetC22_2: C22.2 L2.1 U2.5 | length 5.5
  Top Layer w0.3: U2.5 76.835,64.135 77.216,64.516 78.994,64.516 79.756,65.278 C22.2
NetC23_1: C23.1 R10.2 X1.3 | length 5.9
  Top Layer w0.2: X1.3 79.551,76.894 80,77.343 C23.1 81.915,78.359 82.296,78.74 R10.2
NetC24_1: C24.1 R9.1 X1.1 | length 13.6
  Top Layer w0.2: X1.1 77.627,74.803 76.708,74.803 76.708,77.343 81.697,82.332 81.697,82.396 82.233,82.931 R9.1
  Top Layer w0.3: C24.1 77.47,74.677 77.82,75.027 X1.1
NetC25_2: C25.2 D3.K U2.2 U2.3
NetC29_1: C29.1 IC3.1 | length 2.2
  Top Layer w0.3: IC3.1 108.649,105.342 108.717,105.41 C29.1
NetC29_2: C29.2 C31.2 C32.2 C33.2 F1.1 IC3.2 IC3.11 IC3.12 IC3.21 | length 4.5
  Top Layer w0.3: IC3.2 108.013,103.696 108.585,103.124 C29.2
NetC30_1: C30.1 IC3.44 | length 2.2
  Top Layer w0.3: IC3.44 110.589,97.685 C30.1
NetC30_2: C30.2 IC3.43 | length 5
  Top Layer w0.3: IC3.43 108.013,99.686 108.657,100.33 C30.2
NetC34_1: C34.1 IC3.24 | length 4.5
  Top Layer w0.3: C34.1 95.25,99.822 96.012,99.06 96.012,97.748 IC3.24
NetD1_1: D1.1 IC1.6 J3.3 R4.1 | length 41.7
  Top Layer w0.3: IC1.6 125.222,75.184 ; J3.3 121.078,56.896 117.221,56.896 116.078,58.039 116.078,71.247 117.094,72.263 123.952,72.263 125.222,73.533 125.222,75.184 ; R4.1 126.858,72.024 D1.1 125.696,75.658 125.222,75.184
NetD1_2: D1.2 IC1.7 J2.1 J3.2 | length 34.6
  Top Layer w0.3: J3.2 118.618,68.453 J2.1 120.213,70.048 120.213,70.45 120.389,70.626 128.665,70.626 129.921,71.882 129.921,75.946 129.159,76.708 127.889,76.708 ; IC1.7 125.17,76.454 125.424,76.708 127.889,76.708 ; D1.2 128.143,75.673 128.143,76.454 127.889,76.708
NetF2_2: F2.2 P5.1 | length 6.9
  Top Layer w0.5: P5.1 78.486,118.832 81.538,115.78 F2.2
NetF3_2: F3.2 P5.2 | length 5.9
  Top Layer w0.5: P5.2 75.946,119.253 77.724,117.475 F3.2
NetF4_2: F4.2 P5.3 | length 5.2
  Top Layer w0.5: P5.3 73.406,119.253 73.787,118.872 F4.2
NetF5_2: F5.2 P5.4 | length 5.6
  Top Layer w0.5: F5.2 69.977,117.856 70.866,118.745 P5.4
NetF6_2: F6.2 P5.5 | length 6
  Top Layer w0.5: F6.2 66.167,117.475 68.084,119.392 68.084,120.916 P5.5
NetF7_2: F7.2 P5.6 | length 6.5
  Top Layer w0.5: F7.2 62.858,116.408 62.858,117.341 65.493,119.976 65.493,120.865 P5.6
NetIC2_4: IC2.4 R8.1 | length 2.6
  Top Layer w0.3: R8.1 67.771,79.842 IC2.4
NetIC2_5: IC2.5 R5.1 R7.2 | length 5.3
  Top Layer w0.3: R7.2 R5.1 73.406,82.096 73.206,82.296 IC2.5
NetIC3_28: IC3.28 R14.2 | length 10.6
  Top Layer w0.3: R14.2 98.679,90.297 100.584,92.202 100.584,94.742 98.556,96.77 98.556,97.618 IC3.28
NetIC5_39: IC5.39 LED1.A | length 13.3
  Top Layer w0.2: IC5.39 110.375,78.752 112.141,80.518 LED1.A
NetIC5_60: IC5.60 R2.2 | length 8.3
  Top Layer w0.2: R2.2 91.313,90.297 94.897,86.713 IC5.60
NetJ2_2: J2.2 R4.2 | length 5
  Top Layer w0.3: J2.2 126.867,69.215 R4.2
NetLED1_K: LED1.K R3.1 | length 4.1
  Top Layer w0.3: LED1.K 116.199,86.112 R3.1
NetR7_1: R7.1 VR1.1 VR1.W | length 22.8
  Top Layer w0.3: VR1.1 VR1.W 67.564,63.881 70.231,66.548 70.231,73.66 71.247,74.676 R7.1
NFAULT_DRV1: IC3.26 IC5.1 R12.2 | length 22.9
  Top Layer w0.2: IC5.1 92.008,83.252 v1(93.091,82.169)
  Top Layer w0.3: IC3.26 97.219,95.314 R12.2 98.107,95.187 98.679,94.615 v1(98.679,94.234)
  Bottom Layer w0.2: v1(93.091,82.169) 93.091,87.249 94.615,88.773 94.615,92.075 96.774,94.234 v1(98.679,94.234)
NHOME_DRV1: IC3.27 IC5.22 R13.2 | length 29.6
  Top Layer w0.2: v1(95.377,80.899) 95.377,73.784 IC5.22
  Top Layer w0.3: v1(97.155,93.345) R13.2 98.171,92.075 99.695,93.599 99.695,94.869 97.862,96.702 97.862,97.676 IC3.27
  Bottom Layer w0.2: v1(95.377,80.899) 95.377,91.567 v1(97.155,93.345)
OSC_IN: IC5.5 R9.2 | length 9.2
  Top Layer w0.2: R9.2 84.582,83.703 84.699,83.82 88.646,83.82 89.027,83.439 89.027,81.788 89.563,81.252 IC5.5
OSC_OUT: IC5.6 R10.1 | length 7.1
  Top Layer w0.2: R10.1 85.471,80.01 86.741,81.28 88.907,81.28 89.435,80.752 IC5.6
RESET: C28.2 D4.2 IC5.7 J1.3 R11.1 SW1.1 | length 101.4
  Top Layer w0.2: v1(87.63,78.867) C28.2 87.745,80.252 IC5.7
  Top Layer w0.3: R11.1@94.742,63.5 94.742,62.484 96.901,60.325 96.901,57.272 96.175,56.546 SW1.1 96.405,56.071 96.405,55.106 96.774,54.737 123.19,54.737 131.953,63.5 131.953,86.36 130.429,87.884 128.778,87.884 J1.3 ; v1(94.742,65.024) R11.1 94.869,63.5 D4.2
  Bottom Layer w0.3: v1(87.63,78.867) 87.63,75.311 94.742,68.199 v1(94.742,65.024)
SPI2_MISO: IC3.36 IC5.38 | length 24.1
  Top Layer w0.2: IC5.38 105.025,78.252 105.299,77.978 v1(105.41,77.978) ; IC3.36 103.569,91.122 106.045,88.646 v1(106.045,81.788)
  Bottom Layer w0.2: v1(105.41,77.978) 105.41,81.153 v1(106.045,81.788)
SPI2_MOSI: IC3.37 IC5.41 | length 23.1
  Top Layer w0.2: IC5.41 102.389,79.756 106.045,79.756 106.934,80.645 106.934,92.837 104.203,95.568 IC3.37
SPI2_NSS_DRV1: IC3.34 IC5.58 | length 15.1
  Top Layer w0.2: IC5.58 95.897,86.753 102.299,93.155 IC3.34
SPI2_SCK: IC3.38 IC5.42 | length 23.2
  Top Layer w0.2: IC5.42 103.747,80.252 v1(104.14,80.645) ; IC3.38 104.839,95.694 108.204,92.329 v1(108.204,83.185)
  Bottom Layer w0.2: v1(104.14,80.645) 104.14,81.153 106.172,83.185 v1(108.204,83.185)
TIM2_CH1_STEP: IC3.39 IC5.50 | length 14.9
  Top Layer w0.2: v1(99.695,89.027) 99.773,88.949 99.773,88.43 99.881,88.322 99.881,85.256 IC5.50 ; v1(105.473,96.33) IC3.39
  Bottom Layer w0.2: v1(99.695,89.027) 99.695,90.552 v1(105.473,96.33)
TIM5_CH1_STEP: IC5.56 P4.2 | length 44.2
  Top Layer w0.2: IC5.56 96.905,85.248 96.905,86.618 v1(98.298,88.011)
  Bottom Layer w0.2: v1(98.298,88.011) 100.33,88.011 112.395,100.076 112.395,104.902 120.182,112.689 P4.2
Vref_DRV1: IC3.33 VR2.W | length 17.7
  Top Layer w0.3: IC3.33 101.683,97.705 101.683,98.657 101.982,98.956 106.576,98.956 109.347,101.727 111.887,101.727 112.776,102.616 VR2.W
pads on no net: IC3.29 IC3.30 IC3.31 IC3.32 IC3.35 IC5.2 IC5.3 IC5.4 IC5.8 IC5.9 IC5.10 IC5.11 IC5.15 IC5.16 IC5.17 IC5.20 IC5.21 IC5.23 IC5.24 IC5.25 IC5.26 IC5.27 IC5.28 IC5.29 IC5.35 IC5.36 IC5.40 IC5.43 IC5.44 IC5.45 IC5.51 IC5.52 IC5.53 IC5.54 IC5.57 IC5.59 IC5.61 P6.0 P6.2 P6.5 SW1.0

## Polygon pours and split planes (outlines as drawn)
AOUT1_DRV1 on Top Layer "AOUT1_DRV1_L01_P014" (solid, pour order 14): 106.576,107.64 106.587,107.63 106.959,107.258 106.959,104.481 105.273,104.481 105.239,104.515 105.239,107.017 105.862,107.64 106.041,107.64
AOUT2_DRV1 on Top Layer "AOUT2_DRV1_L01_P013" (solid, pour order 13): 104.133,107.694 104.271,107.694 104.624,107.694 105.083,107.235 105.055,105.865 105.083,104.521 105.055,104.493 103.361,104.493 103.335,104.518 103.335,106.896
BOUT1_DRV1 on Top Layer "BOUT1_DRV1_L01_P012" (solid, pour order 12): 98.898,104.506 98.908,104.517 100.593,104.517 100.593,107.382 100.469,107.495 100.286,107.696 99.993,107.701 99.695,107.696 98.898,106.899
BOUT2_DRV1 on Top Layer "BOUT2_DRV1_L01_P011" (solid, pour order 11): 98.705,104.479 98.718,104.491 98.717,104.504 98.717,106.14 98.298,106.559 98.298,107.402 98.131,107.569 97.714,107.569 97.594,107.449 97.594,107.263 96.989,106.658 96.989,104.96 96.986,104.969 96.986,104.518 96.982,104.515 97.019,104.479
NetC11_2 on Top Layer "NETC11_2_L01_P010" (solid, pour order 10): 74.041,85.725 74.041,88.519 78.359,92.837 78.359,97.536 78.105,97.79 70.739,97.79 70.358,98.171 66.421,98.171 66.421,94.869 71.12,90.17 71.12,87.757 72.393,86.484 72.393,85.754 72.427,85.72 72.432,85.725
GND on Top Layer "GND_L01_P008" (solid, pour order 8): 58.42,83.096 58.571,83.247 66.232,83.247 66.294,83.185 66.294,78.232 66.548,77.978 68.707,77.978 68.961,77.724 68.961,67.945 65.024,67.945 63.119,66.04 61.341,66.04 60.452,66.929 60.452,78.994 58.42,81.026
+5V on Top Layer "+5V_L01_P009" (solid, pour order 9): 66.54,103.759 66.536,102.268 66.54,100.838 72.517,100.838 73.66,101.981 76.2,101.981 76.2,103.632 76.073,103.759
+48V on Top Layer "+48V_L01_P006" (solid, pour order 3): 60.706,93.472 60.706,86.868 59.436,85.598 58.42,85.598 58.293,85.471 58.293,83.82 58.42,83.693 66.294,83.693 66.929,83.058 68.58,83.058 68.707,83.185 68.707,85.217 68.58,85.344 66.548,85.344 63.754,88.138 63.754,112.141 80.465,112.141 80.55,112.057 81.812,112.057 81.82,112.064 81.82,112.059 83.234,112.059 83.534,111.76 86.178,111.76 86.233,111.815 86.233,114.225 86.271,114.263 86.233,114.3 84.574,114.3 83.923,113.649 80.572,113.649 80.302,113.919 61.116,113.919 60.706,113.509
NetC29_2 on Top Layer "NETC29_2_L01_P004" (solid, pour order 4): 107.918,110.624 108.059,110.624 108.231,110.451 108.237,110.284 108.237,104.444 107.829,104.444 107.788,104.485 107.788,109.421 107.179,110.029 102.569,110.029 102.541,110.057 102.541,104.515 102.544,104.512 102.503,104.471 101.469,104.471 101.434,104.506 101.434,108.497 101.219,108.712 96.52,108.712 96.18,108.372 96.18,104.519 96.146,104.485 95.771,104.485 95.72,104.536 95.72,107.353 94.361,108.712 87.884,108.712 87.757,108.839 87.757,114.173 87.884,114.3 89.408,114.3 89.408,111.76 90.551,110.617 101.981,110.617 101.99,110.608
+3V3 on Top Layer "+3V3_L01_P002" (solid, pour order 2): 75.438,54.864 75.311,54.991 75.311,56.642 75.438,56.769 87.757,56.769 87.884,56.642 87.884,54.991 87.757,54.864
NetC25_2 on Top Layer "NETC25_2_L01_P001" (solid, pour order 1): 73.66,67.183 74.041,66.802 75.184,66.802 75.565,66.421 77.089,66.421 77.216,66.294 77.216,65.532 77.089,65.405 74.041,65.405 73.533,64.897 71.501,64.897 71.247,65.151 71.247,71.882 71.374,72.009 73.533,72.009 73.66,71.882
NetC22_2 on Top Layer "NETC22_2_L01_P000" (solid, pour order 0): 75.606,60.411 75.377,60.18 75.377,58.657 75.367,58.646 75.408,58.605 78.012,58.605 78.075,58.667 78.075,60.332 77.112,61.295 77.112,63.799 77.086,63.824 76.604,63.824 76.57,63.79 76.561,63.79 76.561,63.482 76.567,63.477 76.566,63.472 76.566,61.378 76.57,61.375
GND on Int1 (GND) (split plane): 132.429,124.049 132.567,123.992 132.691,123.909 132.797,123.803 132.88,123.679 132.937,123.54 132.967,123.394 132.967,123.319 132.967,52.834 132.967,52.759 132.937,52.612 132.88,52.474 132.797,52.35 132.691,52.244 132.567,52.161 132.429,52.103 132.282,52.074 47.677,52.074 47.53,52.103 47.392,52.161 47.268,52.244 47.162,52.35 47.079,52.474 47.022,52.612 46.992,52.759 46.992,52.834 46.992,123.319 46.992,123.394 47.022,123.54 47.079,123.679 47.162,123.803 47.268,123.909 47.392,123.992 47.53,124.049 47.677,124.078 132.282,124.078
GND on Int2 (GND) (split plane): 132.429,124.049 132.567,123.992 132.691,123.909 132.797,123.803 132.88,123.679 132.937,123.54 132.967,123.394 132.967,123.319 132.967,52.834 132.967,52.759 132.937,52.612 132.88,52.474 132.797,52.35 132.691,52.244 132.567,52.161 132.429,52.103 132.282,52.074 47.677,52.074 47.53,52.103 47.392,52.161 47.268,52.244 47.162,52.35 47.079,52.474 47.022,52.612 46.992,52.759 46.992,52.834 46.992,123.319 46.992,123.394 47.022,123.54 47.079,123.679 47.162,123.803 47.268,123.909 47.392,123.992 47.53,124.049 47.677,124.078 132.282,124.078

## Silkscreen, mask and mechanical layers (free items; w line width, h text height)
Mechanical 1:
  lines w0.381: 46.482,52.834 ccw(c47.752,52.834) 47.752,51.564 132.207,51.564 ccw(c132.207,52.834) 133.477,52.834 133.477,123.319 ccw(c132.207,123.319) 132.207,124.589 58.42,124.589 47.752,124.589 ccw(c47.752,123.319) 46.482,123.319 46.482,52.834

## Text inside footprints (layer, text, board x,y; h text height)
J1: Top Overlay "1" at 129.159,83.185 h1.27 r90; Top Overlay "2" at 126.619,82.677 h1.27 r90; Top Overlay "5" at 129.159,91.821 h1.27 r90; Top Overlay "6" at 126.619,91.821 h1.27 r90
U2: Top Overlay "*" at 78.166,66.516 h1.27 r270; Mechanical 13 "*" at 76.987,65.43 h1.27 r270